# Altium PCB RPi5_Sensor_Carrier.PcbDoc
Units mm, origin at the board's own origin, x right, y up, seen from the top; angles counter-clockwise.
Board outline 40.04 x 85.08 mm, 2 copper layers (Top Layer, Bottom Layer), stack 1.48 mm thick; 9 components, 9 nets, 38 pads, 109 vias.
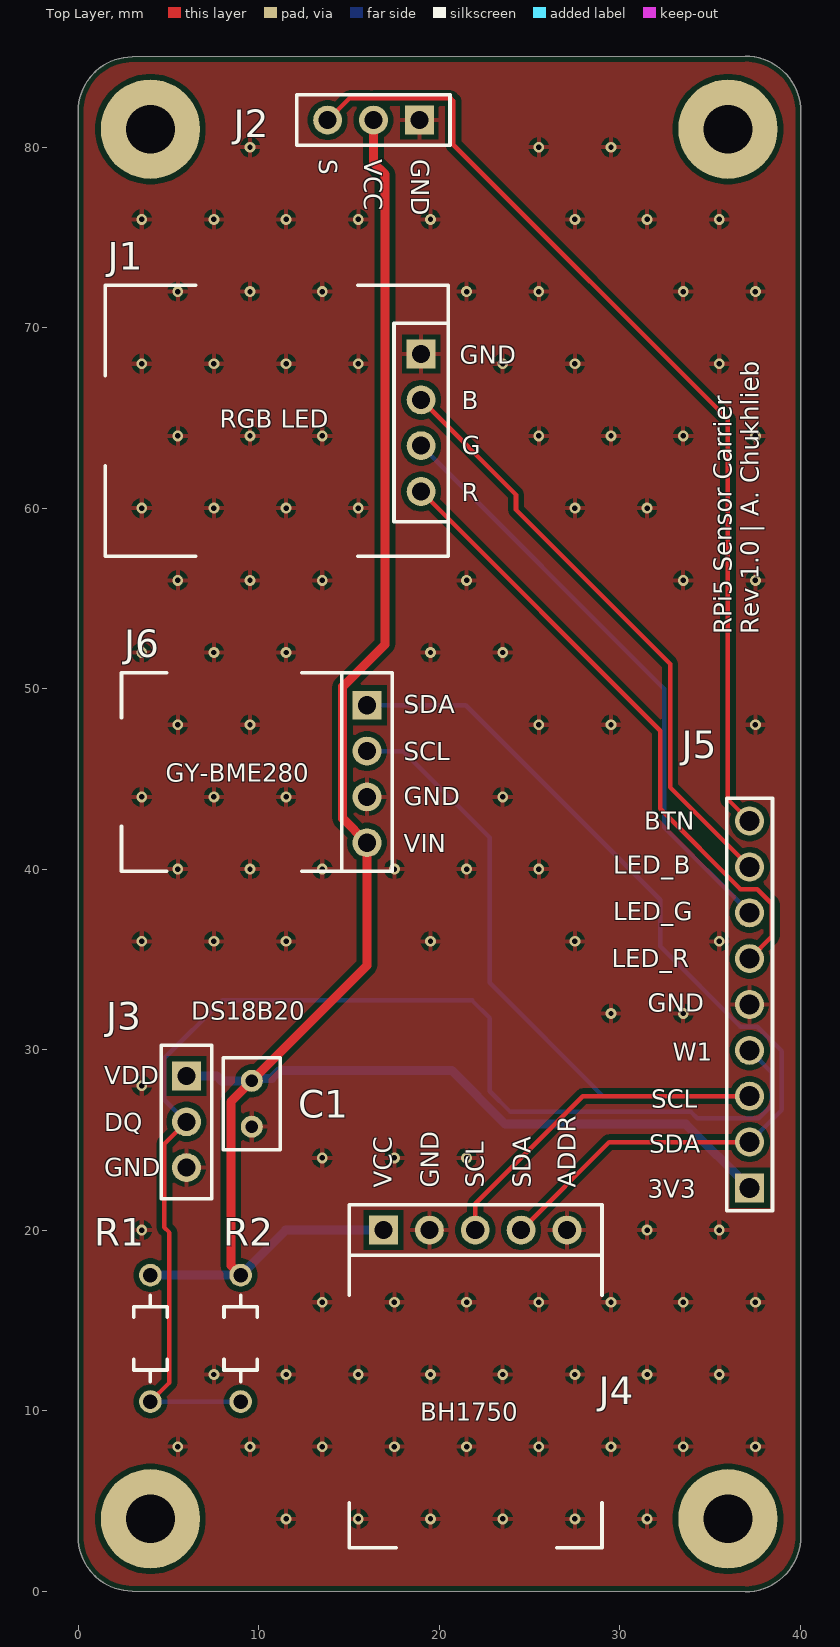
[diagram p0: Top Layer view]
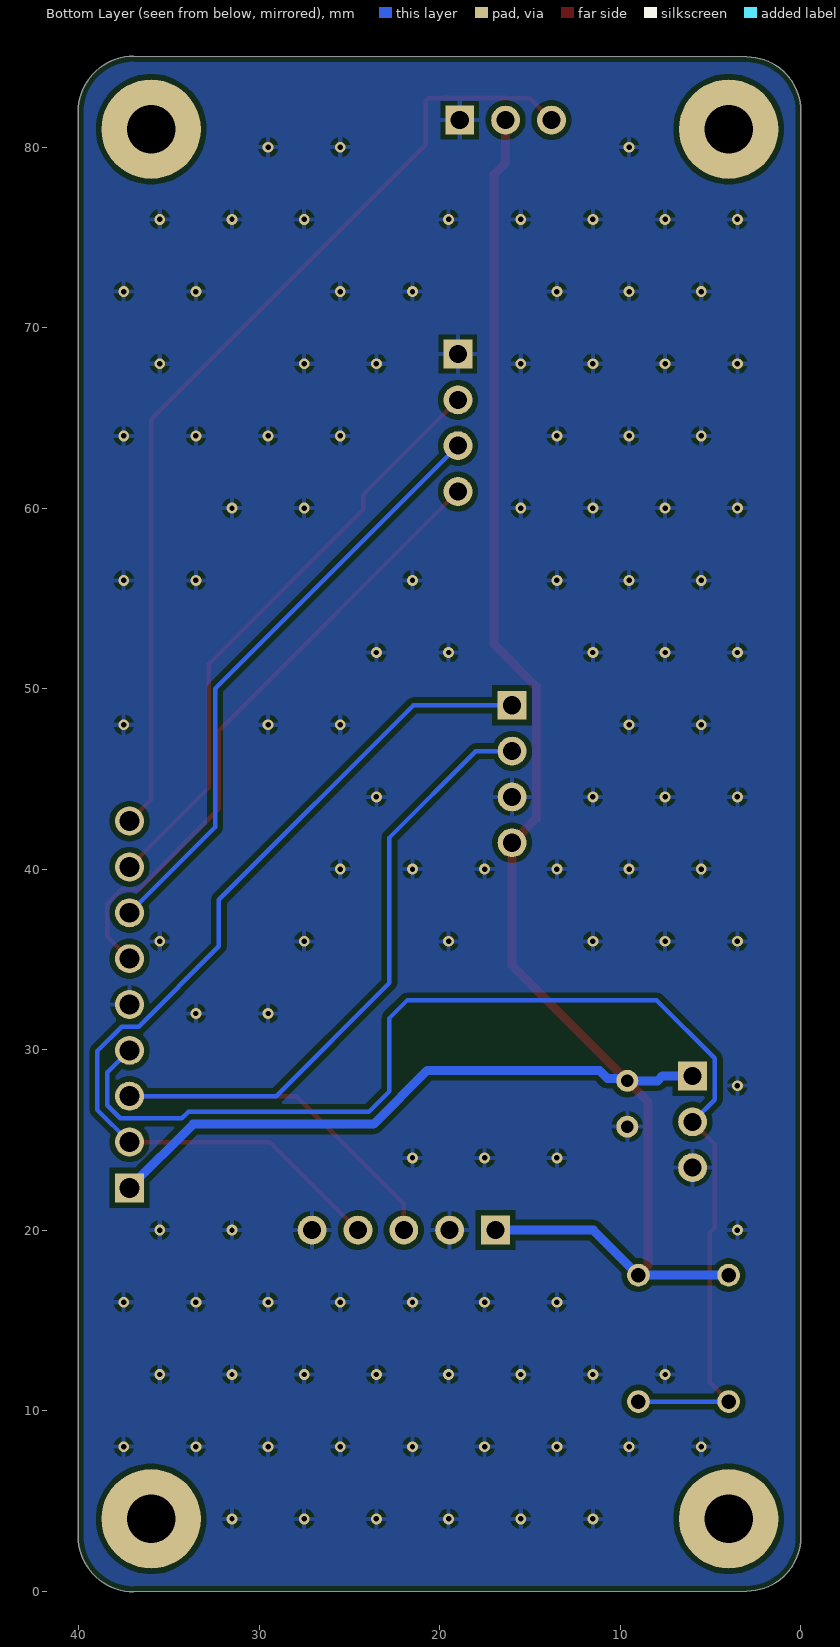
[diagram p1: Bottom Layer view, seen from below]
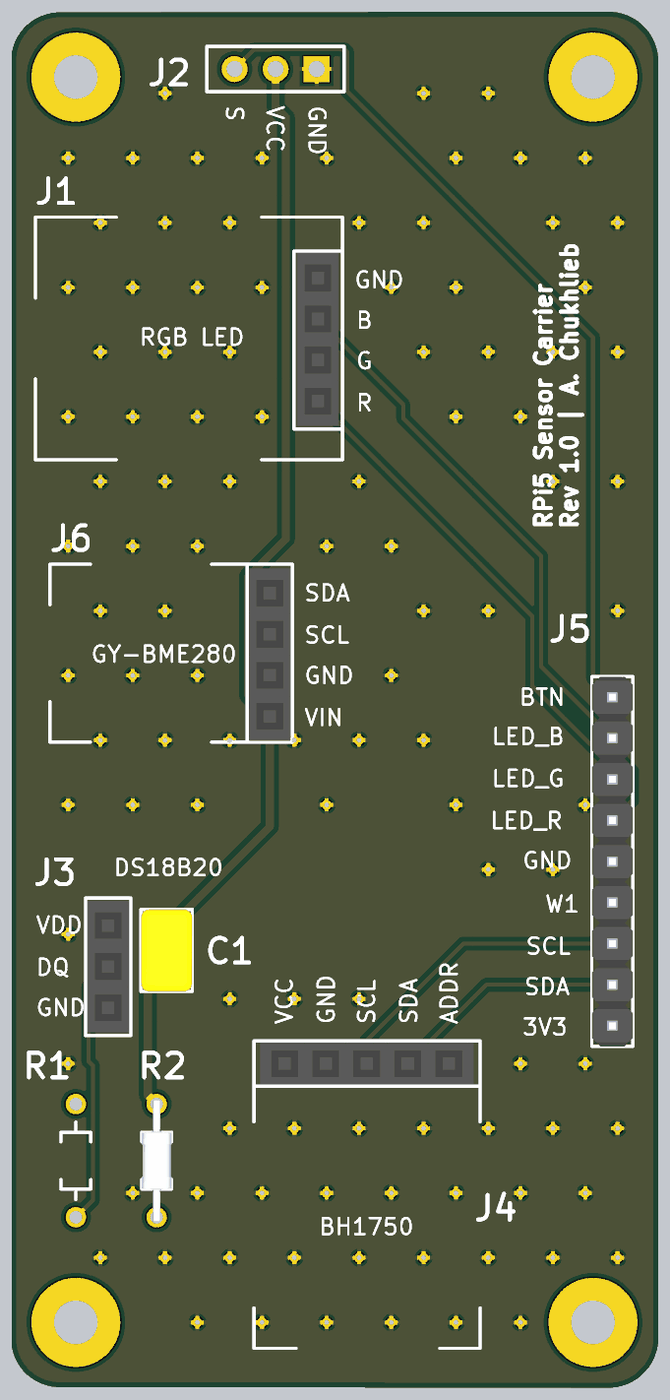
[diagram p2: 3D render of the assembled board from above, using the file's embedded part models]

## Layer stack, top to bottom
Top Solder: solder mask 0.0102, Solder Resist, Dk 3.5
Top Layer: signal copper 0.0356
Dielectric 1: dielectric 1.4086, FR-4, Dk 4.8
Bottom Layer: signal copper 0.0356
Bottom Solder: solder mask 0.0102, Solder Resist, Dk 3.5

## Board outline
0,3 0,82 cw(c3,82) 3,85 36.959,85.041 cw(c36.959,81.96) 40.04,81.96 40.04,3.04 cw(c36.959,3.04) 36.959,-0.041 3,0 cw(c3,3)

## Design rules (kind name [scope] priority, off if disabled: settings)
BoardOutlineClearance [All] p1: gap=0.254 ignorepadtopadclearanceinfootprint=FALSE except(0: Arc-SplitContinuation Track-SplitContinuation SMDPad-SplitContinuation THPad-SplitContinuation Via-SplitContinuation Fill-SplitContinuation Poly-SplitContinuation Region-SplitContinuation Text-SplitContinuation; 0.3: Arc-OutlineEdge Track-OutlineEdge SMDPad-OutlineEdge THPad-OutlineEdge Via-OutlineEdge Fill-OutlineEdge Poly-OutlineEdge Region-OutlineEdge Text-OutlineEdge)
Clearance [All] p1: gap=0.3 ignorepadtopadclearanceinfootprint=TRUE
HoleSize [All] p1: absolutevalues=TRUE maxlimit=6.3 minlimit=0.3 maxpercent=80.000 minpercent=20.000
MinimumAnnularRing [All] p1: minimumring=0.15
PolygonConnect [All] p1: connectstyle=Relief reliefconductorwidth=0.254 reliefentries=4 polygonreliefangle="90 Angle" airgapwidth=0.254
RoutingVias [All] p1: holewidth=0.3 width=0.6 viastyle="Through Hole" minholewidth=0.3 minwidth=0.6 maxholewidth=0.3 maxwidth=0.6
SolderMaskExpansion [All] p1: expansion=0.102 istentingtop=FALSE
UnRoutedNet [All] p1: checkbadconnections=TRUE
Width Width_Custom [InNet('+3V3') OR InNet('GND')] p1: maxlimit=1 minlimit=0.3 preferedwidth=0.5
Width [All] p2: maxlimit=1.5 minlimit=0.2 preferedwidth=0.25
28 further rules are at their usual default settings.

## Components (designator, comment, footprint, x,y, rotation, side; value= is the part's Value field where it differs from the comment)
C1 "0.1uF" CAP_RAD_2.54mm 9.617,27 r90 top
J1 "RGB_LED" J_RGB_LED 19,68.54 r0 top
J2 "KY-004_button" J_BUTTON 18.9,81.5 r270 top
J3 "DS18B20 temperature sensor" J_DS18B20 6,28.54 r0 top
J4 "BH1750 Light Sensor" J_GY-302 16.92,20 r90 top
J5 "Raspberry_Header" J_Raspberry_Header 37.2,22.34 r0 top
J6 "GY-BME280 Barometer sensor" J_GY-BME280 16,49.08 r0 top
R1 "4.7k" RES_AXIAL_0.25W_P7.62mm 4,14 r90 top
R2 "4.7k" RES_AXIAL_0.25W_P7.62mm 9,14 r90 top

## Footprints (in the part's own frame and the unit in brackets; to place one, negate y for a bottom-side part, rotate by r counter-clockwise, add the part's x,y. Pads: shape width x height; smd on the part's side, far side on the other; paste and mask are expansions set on the pad)
CAP_RAD_2.54mm [mm]
  round 1.218 hole 0.7 mask+0.102: 1(-1.27,0) 2(1.27,0)
  silkscreen extent -2.54,-1.59 2.54,1.59, body extent -2.54,-1.59 2.54,1.59, height 5.08
J_BUTTON [mm]
  rect 1.6x1.6 hole 1: 1(0,0)
  round 1.6 hole 1: 2(0,-2.54) 3(0,-5.08)
  silkscreen extent -1.4,-6.8 1.4,1.7
J_DS18B20 [mm]
  rect 1.6x1.6 hole 1: 1(0,0)
  round 1.6 hole 1: 2(0,-2.54) 3(0,-5.08)
  silkscreen extent -1.4,-6.8 1.4,1.7, body extent -1.27,-6.6 1.27,1.52, height 8.51
J_GY-302 [mm]
  rect 1.6x1.6 hole 1: 1(0,0)
  round 1.6 hole 1: 2(0,-2.54) 3(0,-5.08) 4(0,-7.62) 5(0,-10.16)
  silkscreen extent -17.6,-12.1 1.4,1.9, body extent -1.27,-11.68 1.27,1.52, height 8.51
J_GY-BME280 [mm]
  rect 1.6x1.6 hole 1: 1(0,0)
  round 1.6 hole 1: 2(0,-2.54) 3(0,-5.08) 4(0,-7.62)
  silkscreen extent -13.6,-9.2 1.4,1.8, body extent -1.27,-9.13 1.27,1.53, height 8.51
J_Raspberry_Header [mm]
  rect 1.605x1.605 / inner round 1.605 / far side rect 1.605x1.605 hole 1.1: 1(0,0)
  round 1.605 hole 1.1: 2(0,2.54) 3(0,5.08) 4(0,7.62) 5(0,10.16) 6(0,12.7) 7(0,15.24) 8(0,17.78) 9(0,20.32)
  silkscreen extent -1.27,-1.27 1.27,21.59, body extent -1.27,-1.27 1.27,21.59, height 8.74
J_RGB_LED [mm]
  rect 1.6x1.6 hole 1: 1(0,0)
  round 1.6 hole 1: 2(0,-2.54) 3(0,-5.08) 4(0,-7.62)
  silkscreen extent -17.5,-11.2 1.5,3.8, body extent -1.3,-9.1 1.24,1.57, height 8.51
RES_AXIAL_0.25W_P7.62mm [mm]
  round 1.258 hole 0.8 mask+0.102: 1(-3.5,0) 2(3.5,0)
  silkscreen extent -2.4,-0.93 2.4,0.93, body extent -2.54,-2.54 2.54,2.54, height 2.54

## Part data
C1: library part CAP
J3: library part DS18B20
J4: library part GY-302_BH1750
J6: library part GY-BME280
R1 R2: library part RES

## Free pads (board coordinates)
  round 5.5 hole 2.7 unplated: MH1(4,81) MH2(36,81) MH3(4,4) MH4(36,4)

## Via types
v1: diameter 0.6, hole 0.3, Top Layer to Bottom Layer, 109 vias

## Nets (pads, with @x,y where several pads share a name; then routed paths per layer and width w, separated by ;. In a path a pad name is that pad's centre, name@x,y a point inside that pad or via, vN(x,y) a via of type N, cw(c..) or ccw(c..) an arc to the next point about the centre after c; other vN are vias at no path point)
+3.3V: C1.2 J2.2 J3.1 J4.1 J5.1 J6.4 R1.2 R2.2 | length 117.4
  Top Layer w0.5: R2.2 8.458,18.042 8.458,27.111 C1.2 16,34.653 J6.4 14.65,42.81 14.65,50.108 17,52.458 17,78.495 16.36,79.135 J2.2
  Bottom Layer w0.5: R1.2 R2.2 11.5,20 J4.1 ; J3.1 7.67,28.54 7.94,28.27 C1.2 9.754,28.407 10.725,28.407 11.168,28.85 20.69,28.85 23.669,25.871 33.669,25.871 J5.1
GND: C1.1 J1.1 J2.1 J3.3 J4.2 J4.5 J5.5 J6.3
  other v1: 11.52,4 15.52,4 19.52,4 23.52,4 27.52,4 31.52,4 5.52,8 9.52,8 13.52,8 17.52,8 21.52,8 25.52,8 29.52,8 33.52,8 37.52,8 7.52,12 11.52,12 15.52,12 19.52,12 23.52,12 27.52,12 31.52,12 35.52,12 13.52,16 17.52,16 21.52,16 25.52,16 29.52,16 33.52,16 37.52,16 3.52,20 31.52,20 35.52,20 13.52,24 17.52,24 21.52,24 3.52,28 29.52,32 33.52,32 3.52,36 7.52,36 11.52,36 19.52,36 27.52,36 35.52,36 5.52,40 9.52,40 13.52,40 17.52,40 21.52,40 25.52,40 3.52,44 7.52,44 11.52,44 23.52,44 5.52,48 9.52,48 25.52,48 29.52,48 37.52,48 3.52,52 7.52,52 11.52,52 19.52,52 23.52,52 5.52,56 9.52,56 13.52,56 21.52,56 33.52,56 37.52,56 3.52,60 7.52,60 11.52,60 15.52,60 27.52,60 31.52,60 5.52,64 9.52,64 13.52,64 25.52,64 29.52,64 33.52,64 37.52,64 3.52,68 7.52,68 11.52,68 15.52,68 23.52,68 27.52,68 35.52,68 5.52,72 9.52,72 13.52,72 21.52,72 25.52,72 33.52,72 37.52,72 3.52,76 7.52,76 11.52,76 15.52,76 19.52,76 27.52,76 31.52,76 35.52,76 9.52,80 25.52,80 29.52,80
NetJ1_2: J1.2 J5.8 | length 33.4
  Top Layer w0.25: J1.2 24.256,60.744 24.256,59.904 32.795,51.365 32.795,44.525 J5.8
NetJ1_3: J1.3 J5.7 | length 33.4
  Bottom Layer w0.25: J1.3 32.458,50.002 32.458,42.322 J5.7
NetJ1_4: J1.4 J5.6 | length 35
  Top Layer w0.25: J1.4 32.245,47.675 32.245,43.339 36.692,38.893 37.623,38.893 38.427,38.088 38.427,36.268 J5.6
NetJ2_3: J2.3 J5.9 | length 54.2
  Top Layer w0.25: J2.3 15.028,82.708 16.156,82.708 cw(c16.36,81.5) 16.36,82.725 19.876,82.725 ; 19.877,82.725 20.635,82.708 20.708,82.635 20.781,82.561 20.781,80.14 36,64.921 36,43.86 J5.9
NetJ3_2: J3.2 J5.4 R1.1 R2.1 | length 69.5
  Top Layer w0.25: R1.1 5.054,11.554 5.054,19.866 4.775,20.145 4.775,24.775 J3.2
  Bottom Layer w0.25: R1.1 R2.1 ; J3.2 4.775,27.225 4.775,29.516 7.984,32.725 21.82,32.725 22.795,31.75 22.795,27.7 23.948,26.546 33.948,26.546 34.302,26.193 37.708,26.193 38.427,26.912 38.427,28.733 J5.4
NetJ4_3: J4.3 J5.3 J6.2 | length 53
  Top Layer w0.25: J4.3 22,21.46 27.96,27.42 J5.3
  Bottom Layer w0.25: J6.2 18.005,46.54 22.795,41.75 22.795,33.7 29.075,27.42 J5.3
NetJ4_4: J4.4 J5.2 J6.1 | length 52.9
  Top Layer w0.25: J4.4 29.42,24.88 J5.2
  Bottom Layer w0.25: J6.1 21.465,49.08 32.245,38.3 32.245,35.719 36.692,31.273 37.623,31.273 38.977,29.918 38.977,26.658 J5.2

## Polygon pours and split planes (outlines as drawn)
GND on Bottom Layer "GND_L02_P000" (solid, remove dead copper, pour order 0): -1,-1 41,-1 41,86 0,86 -1,85
GND on Top Layer "GND_L01_P002" (solid, remove dead copper, pour order 2): -1,-1 41,-1 41,86 0,86 -1,83 -1,81

## Silkscreen, mask and mechanical layers (free items; w line width, h text height)
Top Overlay:
  text "RGB LED" at 7.85,64.45 h1
  text "RPi5 Sensor Carrier / Rev 1.0 | A. Chukhlieb" at 37.7,53 h1 r90
  text "GY-BME280" at 4.85,44.85 h1
  text "DS18B20" at 6.25,31.65 h1
  text "BH1750" at 18.95,9.45 h1
Mechanical 1:
  the board outline again, w0.2

## Text inside footprints (layer, text, board x,y; h text height)
J1: Top Overlay "GND" at 21.15,67.99 h1; Top Overlay "R" at 21.25,60.39 h1; Top Overlay "G" at 21.25,62.99 h1; Top Overlay "B" at 21.25,65.49 h1
J2: Top Overlay "S" at 13.35,79.33 h1 r270; Top Overlay "VCC" at 15.85,79.33 h1 r270; Top Overlay "GND" at 18.45,79.33 h1 r270
J3: Top Overlay "GND" at 1.45,22.99 h1; Top Overlay "DQ" at 1.45,25.49 h1; Top Overlay "VDD" at 1.45,28.09 h1
J4: Top Overlay "VCC" at 17.37,22.35 h1 r90; Top Overlay "ADDR" at 27.57,22.35 h1 r90; Top Overlay "SCL" at 22.47,22.35 h1 r90; Top Overlay "SDA" at 25.07,22.35 h1 r90; Top Overlay "GND" at 19.97,22.35 h1 r90
J5: Top Overlay "SCL" at 31.75,26.79 h1; Top Overlay "W1" at 32.95,29.39 h1; Top Overlay "LED_G" at 29.65,37.157 h1; Top Overlay "LED_R" at 29.55,34.557 h1; Top Overlay "GND" at 31.55,32.09 h1; Top Overlay "LED_B" at 29.65,39.757 h1; Top Overlay "BTN" at 31.35,42.19 h1; Top Overlay "SDA" at 31.65,24.29 h1; Top Overlay "3V3" at 31.55,21.79 h1
J6: Top Overlay "GND" at 18.05,43.53 h1; Top Overlay "VIN" at 18.05,40.93 h1; Top Overlay "SCL" at 18.05,46.03 h1; Top Overlay "SDA" at 18.05,48.63 h1